# Altium PCB TYH-PD67W 2C1A 协议板0722.pcbdoc (part 2 of 2)
Units mm, origin at the board's own origin, x right, y up, seen from the top; angles counter-clockwise.
Board outline 32.75 x 24.76 mm, 5 copper layers (Top Layer, Signal Layer 3, Signal Layer 1, Signal Layer 2, Bottom Layer), stack 0.941 mm thick; 47 components, 178 nets, 247 pads, 161 vias.
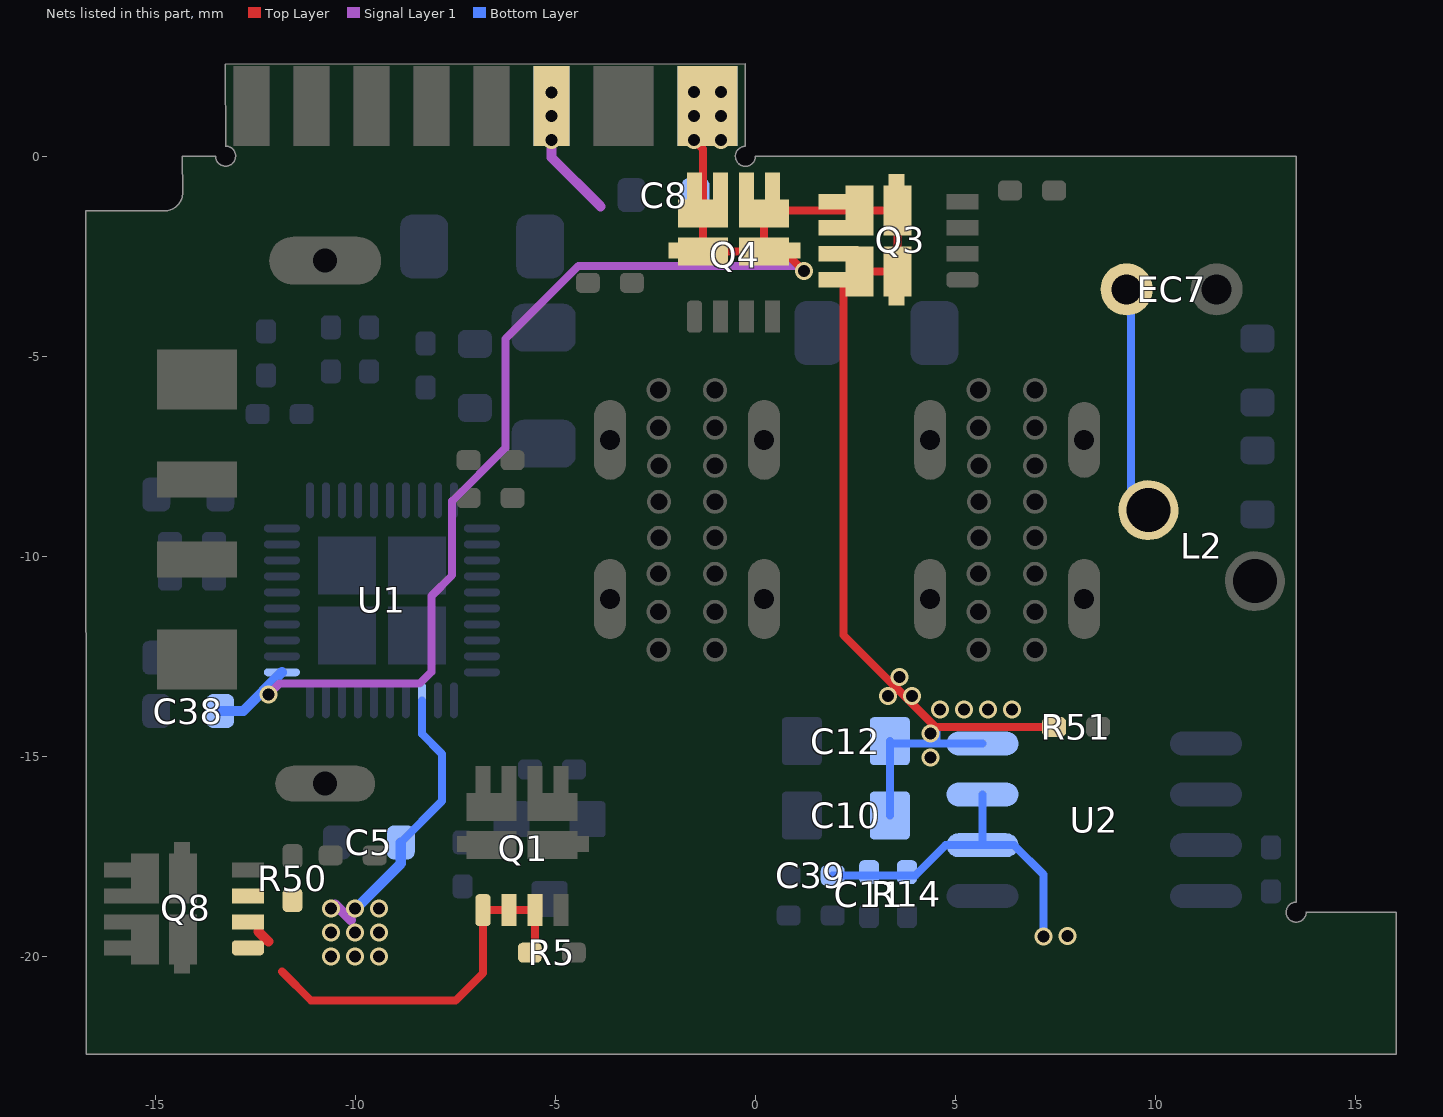
[diagram p4: the nets of this part, all layers, seen from the top]

## Via types
v1: diameter 0.45, hole 0.3, Top Layer to Bottom Layer, tented both sides, 140 vias
v2: diameter 0.5, hole 0.3, Top Layer to Bottom Layer, tented both sides, 21 vias

## Nets (pads, with @x,y where several pads share a name; then routed paths per layer and width w, separated by ;. In a path a pad name is that pad's centre, name@x,y a point inside that pad or via, vN(x,y) a via of type N, cw(c..) or ccw(c..) an arc to the next point about the centre after c; other vN are vias at no path point) (continued)
VIN: C8.1 C10.1 C12.1 C38.2 pad.1 Q3.5 Q3.6 Q3.7 Q3.8 Q4.5 Q4.6 Q4.7 Q4.8 R51.2 U1.1 U2.4 | length 56.2
  Top Layer w0.2: v1(-1.543,0.411) -1.314,0.182 Q4.8@-1.314,-1.432 Q4.8@-1.314,-2.385 Q4.8@0.212,-2.385 ; v1(1.21,-2.872) 0.723,-2.385 Q4.8@0.212,-2.385 ; R51.2@7.463,-14.269 4.495,-14.269 2.191,-11.965 2.191,-3.279 Q3.8@2.595,-2.876 Q3.8@3.547,-2.875 Q3.8@3.547,-1.349 0.295,-1.349 Q4.8@0.212,-1.432 Q4.8@0.212,-2.385
  Signal Layer 1 w0.2: v1(-12.175,-13.454) -11.903,-13.182 -8.398,-13.182 -8.102,-12.887 -8.102,-10.99 -7.585,-10.473 -7.585,-8.622 -6.251,-7.288 -6.251,-4.562 -4.432,-2.743 1.082,-2.743 v1(1.21,-2.872)
  Signal Layer 1 w0.254: v1@-12.267,-13.454 v1(-12.175,-13.454)
  Bottom Layer w0.2: C10.1@3.356,-16.479 C12.1@3.356,-14.621 3.418,-14.683 4.52,-14.683 ; v1@4.52,-14.293 4.52,-14.683 ; U2.4@5.671,-14.683 4.52,-14.683
  Bottom Layer w0.254: C38.2@-13.384,-13.868 -12.81,-13.868 U1.1@-11.843,-12.9
  other v1: 4.377,-15.032 4.377,-14.432 4.606,-13.827 5.206,-13.827 5.806,-13.827 6.406,-13.827 3.307,-13.491 3.907,-13.491 3.602,-13.015 -0.867,0.411 -1.543,1.01 -0.867,1.01
  other v2: -1.543,1.609 -0.867,1.609
VIN_3V: 
VMS: 
VOUT1: C5.2 C11.2 C39.1 EC7.1 L2.1 pad.2@-5.105,1.254 Q1.1 Q1.2 Q1.3 Q8.1 Q8.2 Q8.3 R5.1 R14.1 R50.1 U1.33 U2.2 U2.3 | length 33.2
  Top Layer w0.2: -11.842,-20.379 -11.111,-21.11 -7.501,-21.11 -6.815,-20.423 Q1.1@-6.815,-18.847 Q1.3@-5.515,-18.847 -5.515,-19.778 R5.1@-5.646,-19.909
  Top Layer w0.25: -12.432,-19.383 -12.183,-19.632
  Signal Layer 1 w0.254: v1@-10.515,-18.703 -10.123,-19.094 ; v1(-5.102,0.403) -5.102,-0.028 -3.879,-1.251
  Bottom Layer w0.2: C5.2@-8.871,-17.151 -7.84,-16.12 -7.84,-14.94 -8.343,-14.437 U1.33@-8.343,-13.6 ; C39.1@1.928,-17.979 3.992,-17.979 4.747,-17.223 U2.2@5.671,-17.223 ; U2.3@5.671,-15.953 U2.2@5.671,-17.223 ; v1(7.196,-19.502) 7.196,-17.956 6.463,-17.223 U2.2@5.671,-17.223 ; EC7.1@9.38,-3.424 9.38,-8.405 L2.1@9.821,-8.846
  Bottom Layer w0.254: v1@-9.958,-18.77 -8.871,-17.684 C5.2@-8.871,-17.151
  other v1: -10.61,-20.005 -10.01,-20.005 -9.41,-20.005 7.798,-19.493 -10.61,-19.405 -10.01,-19.405 -9.41,-19.405 -10.61,-18.805 -10.01,-18.805 -9.41,-18.805 -5.102,1.002
  other v2: -5.102,1.601
VXO: 
XGND: 
pads on no net: U1.5 U1.6 U1.7 U1.20 U1.21 U1.37 U1.38 USBA1.0@-10.761,-15.684 USBC1.SBU1 USBC1.SBU2

## Polygon pours and split planes (outlines as drawn)
NewNet42 on Bottom Layer "Bottom Layer-No Net" (solid, remove dead copper, pour order 115): 4.594,-4.33 7.388,-4.33 8.743,-5.686 8.743,-11.826 7.863,-12.706 4.42,-12.706 3.914,-12.2 3.914,-4.927 4.218,-4.623
NewNet24 on Bottom Layer "Bottom Layer-No Net" (solid, remove dead copper, pour order 133): 0.205,-5.373 -4.035,-5.373 -4.29,-5.628 -4.29,-11.881 -3.414,-12.758 -0.012,-12.758 0.787,-11.959 0.787,-5.955
NewNet41 on Bottom Layer "Bottom Layer-No Net" (solid, remove dead copper, pour order 114): 5.433,-6.473 7.115,-6.473 7.297,-6.655 7.297,-11.534 7.138,-11.693 7.097,-11.734 6.873,-11.734 5.384,-11.734 5.235,-11.585 5.235,-6.671 5.433,-6.473
A- on Bottom Layer "Bottom Layer-No Net" (solid, remove dead copper, pour order 119): -12.107,-1.618 -11.862,-1.373 -9.58,-1.373 -7.77,-1.373 -7.583,-1.56 -7.583,-2.991 -7.848,-3.256 -12.343,-3.256 -12.619,-2.981 -12.619,-2.13 -12.107,-1.618
VIN on Bottom Layer "Bottom Layer-No Net" (solid, remove dead copper, pour order 124): -13.714,-14.328 -12.738,-14.328 -11.923,-13.513 -11.393,-12.982 -11.393,-12.883 -11.477,-12.799 -11.534,-12.799 -12.274,-12.799 -12.526,-13.051 -12.816,-13.341 -13.31,-13.341 -13.601,-13.341 -13.812,-13.552 -13.812,-14.222 -13.732,-14.303
NewNet24 on Bottom Layer "Bottom Layer-No Net" (solid, remove dead copper, pour order 93): -5.861,-6.543 -5.034,-6.543 -4.872,-6.381 -4.872,-5.978 -4.485,-5.591 -4.268,-5.373 -4.143,-5.249 -3.324,-5.249 0.081,-5.249 0.787,-5.955 0.787,-11.959 -0.012,-12.758 -3.392,-12.758 -4.29,-11.859 -4.29,-8.579 -4.686,-8.182 -5.45,-8.182 -5.748,-8.182 -6.032,-7.898 -6.176,-7.755 -6.176,-7.584 -6.176,-6.756 -6.01,-6.59
VOUT1 on Bottom Layer "Bottom Layer-No Net" (solid, remove dead copper, pour order 95): -10.635,-20.282 -9.282,-20.282 -8.717,-19.716 -8.088,-19.088 -8.088,-17.466 -8.088,-16.828 -7.798,-16.537 -7.554,-16.293 -7.554,-15.965 -7.554,-15.086 -8.113,-14.527 -8.113,-16.004 -8.355,-16.245 -8.707,-16.598 -9.026,-16.598 -9.098,-16.598 -9.315,-16.814 -9.315,-17.536 -9.853,-18.074 -10.111,-18.332 -10.624,-18.332 -10.919,-18.626 -10.919,-18.848 -10.919,-20.089 -10.754,-20.253
SGND on Bottom Layer "Bottom Layer-No Net" (solid, remove dead copper, pour order 101): -4.07,2.234 -4.07,0.129 -4.566,-0.368 -4.67,-0.471 -7.434,-0.471 -13.886,-0.471 -14.326,-0.911 -14.782,-1.367 -16.741,-1.367 -16.741,-22.448 -16.736,-22.453 12.678,-22.453 12.946,-22.185 12.946,-0.48 12.502,-0.036 0.565,-0.036 0.292,-0.308 0.129,-0.471 -0.45,-0.471 -2.031,-0.471 -2.553,0.05 -2.553,2.237 -4.039,2.237
NewNet42 on Bottom Layer "Bottom Layer-No Net" (solid, remove dead copper, pour order 89): 4.08,-3.551 5.479,-3.551 6.259,-4.346 7.388,-4.346 8.743,-5.728 8.743,-11.99 7.863,-12.888 4.42,-12.888 3.914,-12.372 3.825,-12.28 3.825,-3.708 3.957,-3.573
A- on Top Layer "Bottom Layer-No Net" (solid, remove dead copper, pour order 106): -15,-6.369 -11.702,-6.369 -10.93,-5.598 -9.19,-3.857 -9.19,-3.034 -9.19,-2.072 -9.644,-1.618 -12.107,-1.618 -14.674,-4.185 -15.265,-4.776 -15.265,-5.349 -15.265,-6.183 -15.128,-6.32
VOUT1 on Top Layer "Bottom Layer-No Net" (solid, remove dead copper, pour order 80): -13.12,-18.286 -5.425,-18.286 -5.329,-18.382 -5.329,-20.243 -5.075,-20.498 -4.122,-20.498 -2.799,-19.176 8.698,-19.176 9.852,-18.022 9.852,-10.348 10.584,-9.615 ccw(c9.872,-8.902) 10.88,-8.902 10.88,-7.16 8.443,-4.723 8.443,-3.125 cw(c9.02,-3.125) 9.02,-2.548 9.832,-2.548 cw(c9.832,-2.823) 10.107,-2.823 ccw(c11.61,-2.823) 10.547,-3.886 12.604,-5.942 cw(c11.818,-6.727) 12.929,-6.727 12.929,-21.45 cw(c12.268,-21.45) 12.268,-22.111 -12.781,-22.111 cw(c-12.781,-21.694) -13.197,-21.694 -13.197,-18.363 cw(c-13.12,-18.363)
NewNet41 on Top Layer "Bottom Layer-No Net" (solid, remove dead copper, pour order 87): 4.769,-1.595 6.344,-1.595 6.711,-1.963 6.711,-6.085 7.134,-6.507 7.327,-6.7 7.327,-6.769 7.327,-11.539 7.136,-11.73 5.446,-11.73 5.258,-11.542 5.258,-6.638 5.534,-6.362 5.85,-6.046 5.85,-5.847 5.85,-5.306 5.695,-5.151 4.586,-4.042 4.586,-3.097 4.586,-1.74 4.706,-1.62
NewNet24 on Top Layer "Bottom Layer-No Net" (solid, remove dead copper, pour order 96): -4.198,-5.617 -4.198,-11.809 -3.228,-12.779 0.15,-12.779 0.521,-12.409 0.711,-12.219 0.711,-11.598 0.711,-5.879 0.205,-5.373 -3.954,-5.373 -4.198,-5.617
NewNet42 on Top Layer "Bottom Layer-No Net" (solid, remove dead copper, pour order 97): 7.388,-4.33 8.743,-5.686 8.743,-7.259 8.743,-12.146 7.992,-12.897 4.611,-12.897 3.914,-12.2 3.825,-12.111 3.825,-8.833 3.825,-6.006 4.645,-5.187 5.501,-4.33 7.388,-4.33
SGND on Top Layer "Bottom Layer-No Net" (solid, remove dead copper, pour order 100): -4.07,2.234 -4.07,0.129 -4.566,-0.368 -4.67,-0.471 -7.434,-0.471 -13.886,-0.471 -14.326,-0.911 -14.782,-1.367 -16.741,-1.367 -16.741,-22.448 -16.736,-22.453 12.678,-22.453 12.946,-22.185 12.946,-0.48 12.502,-0.036 0.565,-0.036 0.292,-0.308 0.129,-0.471 -0.45,-0.471 -2.031,-0.471 -2.553,0.05 -2.553,2.237 -4.039,2.237
VIN on Top Layer "Bottom Layer-No Net" (solid, remove dead copper, pour order 79): 7.785,-14.235 7.785,-13.819 ccw(c7.52,-13.819) 7.52,-13.554 4.829,-13.554 3.618,-12.343 3.618,-5.401 4.051,-4.968 4.051,-0.409 3.812,-0.169 -0.173,-0.169 -0.417,0.075 -0.417,2.142 -1.951,2.142 -1.951,-0.729 -2.343,-1.121 -2.343,-2.633 -2.226,-2.75 0.536,-2.75 1.108,-3.322 1.108,-4.967 0.988,-5.086 0.988,-12.092 4.204,-15.309 7.487,-15.309 7.767,-15.029
NewNet2 on Top Layer "Bottom Layer-No Net" (solid, remove dead copper, pour order 82): -7.387,-17.807 -3.679,-17.807 -1.207,-15.335 -1.207,-12.012 -0.714,-11.519 -0.714,-6.6 -1.275,-6.04 -1.275,-5.295 -0.854,-4.874 -0.326,-4.874 -0.034,-4.582 -0.034,-3.619 -0.083,-3.57 -2.354,-3.57 -2.454,-3.671 -2.454,-5.199 -2.184,-5.469 -2.184,-6.068 -2.736,-6.62 -2.736,-11.606 -2.176,-12.167 -2.176,-13.019 -3.679,-14.522 -6.653,-14.522 -7.625,-15.494 -7.625,-17.603 -7.437,-17.791
NewNet24 on Signal Layer 1 "Bottom Layer-No Net" (solid, remove dead copper, pour order 109): -4.373,-11.039 -4.373,-11.877 -3.468,-12.782 -3.289,-12.962 -0.603,-12.962 -0.092,-12.962 0.838,-12.031 1.006,-11.863 1.006,-11.615 1.006,-6.175 0.205,-5.373 -4.209,-5.373 -4.514,-5.678 -4.514,-10.873 -4.385,-11.001
VOUT1 on Signal Layer 1 "Bottom Layer-No Net" (solid, remove dead copper, pour order 116): 8.443,-2.747 8.443,-4.723 9.207,-5.487 10.88,-7.16 10.88,-7.775 10.88,-8.964 cw(c9.939,-8.964) 10.604,-9.629 9.871,-10.362 ccw(c9.919,-10.41) 9.852,-10.41 9.852,-18.022 9.441,-18.432 -11.269,-18.432 -11.459,-18.622 -11.459,-20.349 -11.252,-20.556 12.578,-20.556 12.929,-20.205 12.929,-6.727 10.377,-4.175 9.962,-3.76 9.962,-2.678 9.817,-2.533 8.657,-2.533 8.443,-2.747
NewNet42 on Signal Layer 1 "Bottom Layer-No Net" (solid, remove dead copper, pour order 110): 7.91,-12.909 8.743,-12.052 8.743,-5.73 7.246,-4.188 4.549,-4.188 3.677,-5.085 3.677,-12.245 4.323,-12.909
VOUT1 on Signal Layer 1 "Bottom Layer-No Net" (solid, remove dead copper, pour order 91): -11.459,-20.349 -11.459,-21.597 -10.979,-22.076 12.458,-22.076 12.929,-21.605 12.929,-20.205 12.929,-15.457 12.042,-14.57 10.754,-14.57 10.144,-15.18 9.852,-15.473 9.852,-18.022 9.441,-18.432 -11.269,-18.432 -11.459,-18.622
SGND on Signal Layer 1 "Bottom Layer-No Net" (solid, remove dead copper, pour order 99): -4.07,2.234 -4.07,0.129 -4.566,-0.368 -4.67,-0.471 -7.434,-0.471 -13.886,-0.471 -14.326,-0.911 -14.782,-1.367 -16.741,-1.367 -16.741,-22.448 -16.736,-22.453 12.678,-22.453 12.946,-22.185 12.946,-0.48 12.502,-0.036 0.565,-0.036 0.292,-0.308 0.129,-0.471 -0.45,-0.471 -2.031,-0.471 -2.553,0.05 -2.553,2.237 -4.039,2.237
NewNet2 on Signal Layer 2 "Bottom Layer-No Net" (solid, remove dead copper, pour order 85): -2.176,-13.019 -3.043,-13.886 -3.043,-15.402 -2.834,-15.611 -1.323,-15.611 -1.207,-15.494 -1.207,-12.012 -0.714,-11.519 -0.714,-6.6 -1.275,-6.04 -1.275,-4.577 -1.967,-3.884 -2.668,-3.884 -3.169,-4.385 -3.169,-4.824 -2.794,-5.199 -2.454,-5.199 -2.185,-5.468 -2.185,-6.109 -2.736,-6.661 -2.736,-11.606 -2.176,-12.167
NewNet41 on Signal Layer 2 "Bottom Layer-No Net" (solid, remove dead copper, pour order 94): 5.889,-2.962 6.712,-2.962 6.851,-3.101 6.851,-4.868 6.711,-5.008 6.711,-6.085 7.327,-6.7 7.327,-11.539 7.136,-11.73 5.449,-11.73 5.258,-11.539 5.258,-6.638 5.85,-6.046 5.85,-5.423 5.596,-5.17 5.596,-3.138 5.707,-3.027
NewNet24 on Signal Layer 2 "Bottom Layer-No Net" (solid, remove dead copper, pour order 102): -2.539,-5.403 -3.973,-5.403 -4.198,-5.627 -4.198,-11.809 -3.228,-12.779 0.15,-12.779 0.711,-12.219 0.711,-5.879 0.234,-5.403 -2.539,-5.403
NewNet42 on Signal Layer 2 "Bottom Layer-No Net" (solid, remove dead copper, pour order 103): 7.992,-12.897 4.873,-12.897 3.914,-11.938 3.677,-11.701 3.677,-11.388 3.677,-6.154 4.106,-5.725 4.406,-5.425 6.915,-5.425 8.109,-5.425 8.743,-6.059 8.743,-12.146 7.992,-12.897
SGND on Signal Layer 2 "Bottom Layer-No Net" (solid, remove dead copper, pour order 98): -4.07,2.234 -4.07,0.129 -4.67,-0.471 -13.886,-0.471 -14.782,-1.367 -16.741,-1.367 -16.741,-22.448 -16.736,-22.453 12.678,-22.453 12.946,-22.185 12.946,-0.48 12.502,-0.036 0.565,-0.036 0.129,-0.471 -1.759,-0.471 -2.553,0.323 -2.553,2.237 -4.039,2.237

## Keep-outs
Keep-Out Layer:
  lines w0.1: -13.501,0.004 -14.33,0.004 -14.326,-0.911 cw(c-14.776,-0.913) -14.775,-1.363 -16.741,-1.367 -16.736,-22.453 16.014,-22.453 16.014,-18.896 13.764,-18.896 cw(c13.514,-18.896) 13.514,-18.646 13.514,0.004 -0.005,0.004 ; -13.501,0.004 ccw(c-13.251,0.004) -13.251,0.254 -13.255,2.304 ; -13.255,2.303 -0.255,2.308 ; -0.255,2.304 -0.255,0.25 ccw(c-0.255,0) -0.005,0

## Other copper
Top Layer:
  rectangle net VIN: -0.876,-0.909 -0.417,0.075
  pour cut-out: -9.626,-4.446 -9.626,-4.877 -9.509,-4.994 -9.509,-6.244 -9.032,-6.721 -9.029,-6.721 -9.029,-6.937 -8.795,-7.171 -8.346,-7.171 -8.116,-6.942 -8.116,-6.509 -8.375,-6.25 -8.574,-6.25 -8.854,-5.971 -8.854,-5.022 -8.714,-4.882 -8.714,-4.45 -8.973,-4.191 -9.371,-4.191
  region net SCL: -10.057,2.236 -10.057,-0.06 -9.886,-0.23 -9.31,-0.23 -9.155,-0.076 -9.155,2.236
  region net SDA: -11.557,2.236 -11.557,-0.06 -11.386,-0.23 -10.81,-0.23 -10.655,-0.076 -10.655,2.236
  region net VIN: -1.951,2.142 -1.951,0.047 -1.784,-0.12 -0.612,-0.12 -0.417,0.075 -0.417,2.142
  region net NewNet33: -13.057,2.236 -13.057,-0.06 -12.886,-0.23 -12.31,-0.23 -12.155,-0.076 -12.155,2.236
  region net SWCLK2: -8.557,2.236 -8.557,-0.06 -8.098,-0.519 -7.655,-0.076 -7.655,2.236
  region net SWDIO2: -7.057,2.236 -7.057,-0.06 -6.886,-0.23 -6.31,-0.23 -6.155,-0.076 -6.155,2.236
  region net VOUT1: -5.557,2.236 -5.557,-0.06 -5.386,-0.23 -5.08,-0.23 -4.655,0.194 -4.655,2.236
  region net A+: -15.09,-11.738 -12.955,-11.738 -12.835,-11.858 -12.835,-15.841 -13.808,-16.814 -13.808,-19.938 -14.138,-20.269 -15.863,-20.269 -16.474,-19.657 -16.474,-16.102 -15.207,-14.835 -15.207,-11.855
  region net A-: -11.862,-1.373 -9.889,-1.373 -9.19,-2.072 -9.19,-2.952 -9.563,-3.325 -11.812,-3.325 -12.561,-2.577 -12.561,-2.072
  pour cut-out: -15.411,-13.127 -15.019,-13.519 -13.172,-13.519 -12.631,-12.978 -12.631,-8.325 -12.702,-8.254 -13.017,-8.57 -15.411,-8.57
  region net SRCG_A: -13.009,-17.165 -10.381,-17.165 -10.26,-17.285 -10.26,-17.897 -10.391,-18.027 -13.11,-18.027 -13.196,-17.941 -13.196,-17.352
  region net VOUT1: -13.12,-18.286 -13.197,-18.363 -13.197,-20.559 -12.939,-20.817 -11.669,-20.817 -11.455,-20.603 -11.455,-18.422 -11.592,-18.286
  region net A+: -16.474,-20.778 -16.257,-20.995 -14.118,-20.995 -13.808,-20.685 -13.808,-18.376 -16.339,-18.376 -16.474,-18.511
  region net NewNet2: -3.169,-4.385 -3.169,-4.824 -2.794,-5.199 -2.018,-5.199 -1.77,-4.951 -1.77,-3.757 -1.957,-3.57 -2.354,-3.57
  region net NewNet41: 6.344,-1.595 6.657,-1.595 6.851,-1.789 6.851,-4.868 6.474,-5.245 6.344,-5.115
  region net NewNet28: 4.743,-1.331 6.588,-1.331 6.728,-1.19 6.728,-0.515 6.611,-0.397 4.744,-0.397 4.586,-0.556 4.586,-1.173
  region net NewNet6: 0.285,-4.701 0.742,-4.701 0.836,-4.607 0.836,-3.571 0.327,-3.063 -0.107,-3.063 -0.198,-3.154 -0.097,-3.255 0.114,-3.255 0.234,-3.375 0.234,-4.65
  region net NewNet13: -4.952,-18.291 -3.834,-18.291 cw(c-3.834,-18.466) -3.658,-18.466 -3.658,-19.621 -4.235,-20.198 -4.797,-20.198 -5.057,-19.938 -5.057,-18.396
Signal Layer 1:
  rectangle net VIN: -1.84,0.166 -0.584,1.888
  region net SCL: -10.057,2.236 -10.057,-0.06 -9.886,-0.23 -9.31,-0.23 -9.155,-0.076 -9.155,2.236
  region net SDA: -11.557,2.236 -11.557,-0.06 -11.386,-0.23 -10.81,-0.23 -10.655,-0.076 -10.655,2.236
  region net SWDIO2: -7.057,2.236 -7.057,-0.06 -6.886,-0.23 -6.31,-0.23 -6.155,-0.076 -6.155,2.236
  region net VOUT1: -4.655,2.236 -4.655,0.023 -3.727,-0.905 9.153,-0.905 10.107,-1.859 10.107,-4.252 9.791,-4.567 8.835,-4.567 8.443,-4.175 8.443,-2.125 7.868,-1.551 -4.065,-1.551 -5.557,-0.06 -5.557,2.236
  region net VOUT1: -5.557,2.236 -5.557,-0.06 -5.386,-0.23 -5.08,-0.23 -4.655,0.194 -4.655,2.236
  region net SWCLK2: -8.557,2.236 -8.557,-0.06 -8.386,-0.23 -7.81,-0.23 -7.655,-0.076 -7.655,2.236
  region net NewNet33: -13.057,2.236 -13.057,-0.06 -12.886,-0.23 -12.31,-0.23 -12.155,-0.076 -12.155,2.236
  pour cut-out: 2.521,-4.369 2.521,-3.793 1.372,-2.644 -7.011,-2.644 -8.671,-4.305 -10.781,-4.305 -11.195,-4.719 -11.644,-4.719 -11.878,-4.485 -11.878,-4.049 -11.571,-3.741 -8.956,-3.741 -7.245,-2.03 1.637,-2.03 3.146,-3.539 3.146,-4.366
  region net VIN: 4.204,-15.309 5.308,-15.309 6.668,-13.949 6.668,-13.707 6.515,-13.554 4.589,-13.554 3.754,-12.719 3.475,-12.719 3.019,-13.175 3.019,-14.123
  region net NewNet41: 6.669,-2.95 6.801,-3.082 6.801,-3.97 6.676,-4.096 4.961,-4.096 4.891,-4.026 4.891,-3.947 5.888,-2.95
  region net NewNet2: -3.066,-4.761 -2.036,-4.761 -1.905,-4.63 -1.905,-4.39 -2.351,-3.944 -2.728,-3.944 -3.169,-4.385 -3.169,-4.658
  region net NewNet2: -2.845,-15.056 -1.414,-15.056 -1.293,-15.178 -1.293,-15.406 -1.406,-15.52 -2.829,-15.52 -2.961,-15.388 -2.961,-15.172
Signal Layer 2:
  rectangle net VIN: -1.824,0.158 -0.625,1.882
  region net VOUT1: -10.625,-18.574 -9.299,-18.574 -9.177,-18.696 -9.177,-20.218 -9.29,-20.332 -10.688,-20.332 -10.844,-20.175 -10.844,-18.712 -10.719,-18.586
  region net SWDIO2: -7.057,2.236 -7.057,0.378 -6.735,0.057 -6.155,0.057 -6.155,2.236
  region net VIN: 3.487,-12.764 3.685,-12.764 4.475,-13.554 6.543,-13.554 6.663,-13.674 6.663,-13.997 6.593,-14.067 4.977,-14.067 4.715,-14.329 4.715,-15.13 4.536,-15.309 4.204,-15.309 4.084,-15.188 4.084,-14.113 3.781,-13.809 3.214,-13.809 3.015,-13.61 3.015,-13.236
  region net NewNet33: -13.057,2.236 -13.057,-0.06 -12.886,-0.23 -12.31,-0.23 -12.155,-0.076 -12.155,2.236
  region net SDA: -11.557,2.236 -11.557,-0.06 -11.386,-0.23 -10.81,-0.23 -10.655,-0.076 -10.655,2.236
  region net SCL: -10.057,2.236 -10.057,-0.06 -9.886,-0.23 -9.31,-0.23 -9.155,-0.076 -9.155,2.236
  region net SWCLK2: -8.557,2.236 -8.557,-0.06 -8.386,-0.23 -7.81,-0.23 -7.655,-0.076 -7.655,2.236
  region net VOUT1: -5.557,2.236 -5.557,0.064 -5.349,-0.144 -4.847,-0.144 -4.655,0.048 -4.655,2.236
  region net VOUT1: 9.001,-9.366 9.001,-5.745 8.537,-5.281 8.537,-2.905 8.82,-2.622 9.642,-2.622 9.989,-2.968 9.989,-4.665 10.593,-5.269 10.593,-9.152 10.099,-9.646 9.281,-9.646
Bottom Layer:
  rectangle net NewNet36: -12.486,-6.5 -12.152,-5.471
  rectangle net CPA: -10.559,-5.663 -9.639,-5.102
  region net SCL: -10.057,2.236 -10.057,-0.06 -9.886,-0.23 -9.31,-0.23 -9.155,-0.076 -9.155,2.236
  region net SDA: -11.557,2.236 -11.557,-0.06 -11.386,-0.23 -10.81,-0.23 -10.655,-0.076 -10.655,2.236
  region net VOUT1: -5.557,2.236 -5.557,-0.06 -5.386,-0.23 -5.08,-0.23 -4.655,0.194 -4.655,2.236
  region net SWDIO2: -7.057,2.236 -7.057,-0.06 -6.886,-0.23 -6.31,-0.23 -6.155,-0.076 -6.155,2.236
  region net SWCLK2: -8.557,2.236 -8.557,-0.06 -8.386,-0.23 -7.81,-0.23 -7.655,-0.076 -7.655,2.236
  region net NewNet33: -13.058,2.247 -13.058,-1.24 -13.004,-1.294 -12.996,-1.294 -12.154,-0.451 -12.154,2.247
  pour cut-out: -5.97,-1.944 -6.526,-1.944 -6.948,-2.365 -6.948,-3.089 -7.498,-3.639 -9.965,-3.639 -10.223,-3.897 -10.223,-4.764 -10.028,-4.959 -9.517,-4.959 -9.38,-5.096 -8.93,-5.096 -8.711,-4.878 -8.711,-4.394 -8.57,-4.253 -7.193,-4.253 -6.284,-3.345 -6.284,-2.682 -6.194,-2.592 -5.939,-2.592 -5.837,-2.489 -5.837,-2.019 -5.903,-1.953
  pour cut-out: -10.928,-9.291 -10.574,-9.291 -10.445,-9.161 -10.445,-6.785 -10.749,-6.481 -10.749,-6.008 -11.056,-5.701 -11.056,-4.723 -10.951,-4.618 -10.951,-4.002 -11.162,-3.791 -11.621,-3.791 -11.877,-4.047 -11.877,-4.44 -11.742,-4.574 -11.742,-5.928 -11.943,-6.128 -11.943,-6.728 -11.685,-6.986 -11.252,-6.986 -11.043,-7.195 -11.043,-9.176
  region net NewNet32: -15.263,-7.931 -14.381,-7.931 -14.272,-8.04 -14.272,-10.863 -14.383,-10.974 -15.122,-10.974 -15.387,-10.709 -15.387,-8.055
  region net NewNet34: -13.623,-11.995 -11.444,-11.995 -11.364,-12.075 -11.364,-12.523 -11.439,-12.598 -12.592,-12.598 -12.972,-12.978 -13.672,-12.978 -13.777,-12.873 -13.777,-12.149
  region net VOUT1: 10.289,-9.755 9.389,-9.755 9.001,-9.366 9.001,-5.494 8.443,-4.935 8.443,-2.747 8.657,-2.533 9.817,-2.533 10.107,-2.823 10.107,-4.125 10.738,-4.756 10.738,-9.306
  region net VIN: 2.522,-13.74 3.502,-12.76 3.857,-12.76 4.313,-13.216 6.528,-13.216 6.679,-13.367 6.679,-14.898 6.479,-15.098 4.882,-15.098 4.398,-15.582 4.398,-16.868 4.131,-17.136 2.675,-17.136 2.522,-16.983
  region net NewNet18: -7.531,-17.502 -5.989,-17.502 -5.301,-16.814 -5.301,-15.036 -5.436,-14.901 -5.792,-14.901 -7.654,-16.764 -7.654,-17.379
  region net NewNet2: -2.825,-15.055 -1.423,-15.055 -1.288,-15.19 -1.288,-15.393 -1.419,-15.524 -2.82,-15.524 -2.959,-15.385 -2.959,-15.19
  region net NewNet2: -3.037,-4.79 -2.033,-4.79 -1.888,-4.645 -1.888,-4.394 -2.359,-3.923 -2.707,-3.923 -3.169,-4.385 -3.169,-4.658
  region net VIN: -1.951,2.142 -1.951,-1.272 -1.76,-1.463 -0.787,-1.463 -0.417,-1.094 -0.417,2.142
  region net VFB1: 1.684,-19.317 6.171,-19.317 6.642,-18.846 6.642,-18.293 6.447,-18.098 4.614,-18.098 4.09,-18.622 1.695,-18.622 1.575,-18.742 1.575,-19.209
  region net VOUT1: 7.063,-19.803 7.986,-19.803 8.163,-19.626 8.163,-19.43 7.405,-18.672 7.405,-17.812 6.761,-17.168 6.761,-15.817 6.574,-15.63 4.938,-15.63 4.744,-15.823 4.744,-17.045 4.283,-17.506 1.749,-17.506 1.608,-17.647 1.608,-18.222 1.628,-18.243 3.992,-18.243 4.708,-17.526 6.557,-17.526 6.947,-17.916 6.947,-19.686
  pour cut-out: -5.68,-4.848 -5.68,-4.996 -5.855,-5.171 -8.574,-5.171 -8.756,-5.353 -8.756,-5.649 -9.444,-6.337 -9.444,-9.155 -9.29,-9.309 -8.561,-9.309 -8.445,-9.193 -8.445,-7.27 -8.076,-6.901 -8.076,-6.504 -7.38,-5.808 -5.527,-5.808 -4.997,-5.278 -4.997,-4.848
  pour cut-out: 2.104,-4.08 2.883,-4.08 3.28,-4.476 3.28,-4.87 3.017,-5.132 2.659,-5.132 2.41,-4.883 2.41,-4.771 2.359,-4.72 2.103,-4.72
  region net NewNet41: 5.829,-2.978 6.684,-2.978 6.802,-3.097 6.802,-3.939 6.66,-4.081 6.381,-4.081 5.684,-3.384 5.684,-3.123
  region net SW-SR: 12.279,-8.523 13.042,-8.523 cw(c13.042,-8.739) 13.258,-8.739 13.258,-10.873 cw(c12.701,-10.873) 12.701,-11.429 12.615,-11.429 cw(c12.615,-10.472) 11.938,-11.149 11.936,-11.147 cw(c12.44,-10.643) 11.728,-10.643 11.728,-10.62 cw(c12.498,-10.62) 11.953,-10.075 ccw(c11.768,-9.889) 12.03,-9.889 12.03,-8.701 cw(c12.203,-8.701) 12.203,-8.528
  region net SW-SR: 10.792,-16.247 12.884,-16.247 ccw(c12.884,-15.863) 13.269,-15.863 13.269,-8.745 ccw(c13.042,-8.745) 13.042,-8.519 12.209,-8.519 ccw(c12.209,-8.701) 12.027,-8.701 12.027,-9.415 cw(c11.094,-9.415) 11.754,-10.074 11.003,-10.824 ccw(c12.799,-12.62) 10.259,-12.62 10.259,-15.94 ccw(c10.566,-15.94) 10.566,-16.247
Multi-Layer:
  pour cut-out: -8.774,-6.25 -8.342,-6.25 -8.076,-6.516 -8.076,-6.901 -8.346,-7.171 -8.795,-7.171 -9.029,-6.937 -9.029,-6.505
  pour cut-out: -9.371,-4.191 -8.973,-4.191 -8.714,-4.45 -8.714,-4.882 -8.944,-5.111 -9.392,-5.111 -9.626,-4.877 -9.626,-4.446
  pour cut-out: -11.623,-3.799 -11.225,-3.799 -10.966,-4.058 -10.966,-4.49 -11.195,-4.719 -11.644,-4.719 -11.878,-4.485 -11.878,-4.054
  pour cut-out: 2.659,-5.132 3.017,-5.132 3.28,-4.87 3.28,-4.499 3.012,-4.232 2.658,-4.232 2.384,-4.506 2.384,-4.857

## Silkscreen, mask and mechanical layers (free items; w line width, h text height)
Top Overlay:
  circle w0.1: c-1.068,-9.589 r0.21
  circle w0.1: c-2.468,-9.589 r0.21
  circle w0.1: c-1.068,-12.389 r0.21
  circle w0.1: c-1.068,-11.439 r0.21
  circle w0.1: c-2.478,-10.489 r0.21
  circle w0.1: c-2.478,-11.439 r0.21
  circle w0.1: c-2.478,-12.389 r0.21
  circle w0.1: c6.933,-9.589 r0.21
  circle w0.1: c6.933,-12.389 r0.21
  circle w0.1: c6.933,-11.439 r0.21
  circle w0.1: c5.533,-9.589 r0.21
  circle w0.1: c5.523,-10.489 r0.21
  circle w0.1: c5.523,-11.439 r0.21
  circle w0.1: c5.523,-12.389 r0.21
  circle w0.1: c-1.069,-5.897 r0.21
  circle w0.1: c-1.068,-7.789 r0.21
  circle w0.1: c-1.068,-8.689 r0.21
  circle w0.1: c-1.068,-6.839 r0.21
  circle w0.1: c-2.476,-5.892 r0.21
  circle w0.1: c-2.468,-8.689 r0.21
  circle w0.1: c-2.478,-6.839 r0.21
  circle w0.1: c6.933,-8.689 r0.21
  circle w0.1: c6.933,-7.789 r0.21
  circle w0.1: c5.524,-5.892 r0.21
  circle w0.1: c6.931,-5.897 r0.21
  circle w0.1: c5.523,-6.839 r0.21
  circle w0.1: c6.933,-6.839 r0.21
  circle w0.1: c5.533,-8.689 r0.21
  rectangle: -15.889,-10.569 -14.967,-6.326
  rectangle: -15.889,-7.641 -12.538,-6.326
  lines w0.1: -16.737,-20.853 16.018,-20.849 ; -12.999,-15.696 cw(c-13.001,-15.085) -13.611,-15.084 -13.611,-4.151 -13.623,-3.096 ; -12.999,-15.684 -8.499,-15.684 ccw(c-8.487,-15.084) -7.888,-15.084 -7.899,-3.084 ; -10.761,-9.084 -10.761,-2.484 ; -8.499,-2.484 -12.999,-2.484 ccw(c-12.998,-3.109) -13.623,-3.096 ; -7.899,-3.096 -13.623,-3.096 ; -2.478,-12.389 -2.268,-12.389 ; -1.068,-12.389 -0.858,-12.389 ; 5.523,-12.389 5.733,-12.389 ; 6.933,-12.389 7.143,-12.389 ; -11.611,-16.035 cw(c-11.611,-15.735) -11.611,-15.435 -10.011,-15.435 cw(c-10.011,-15.735) -10.011,-16.035 -11.611,-16.035 ; -11.611,-2.96 cw(c-11.611,-2.66) -11.611,-2.36 -10.011,-2.36 cw(c-10.011,-2.66) -10.011,-2.96 -11.611,-2.96 ; -3.938,-7.689 ccw(c-3.688,-7.689) -3.438,-7.689 -3.438,-6.589 ccw(c-3.688,-6.589) -3.938,-6.589 -3.938,-7.689 ; -3.938,-11.669 ccw(c-3.688,-11.669) -3.438,-11.669 -3.438,-10.569 ccw(c-3.688,-10.569) -3.938,-10.569 -3.938,-11.669 ; -3.312,-12.321 ccw(c-2.062,-12.321) -2.063,-13.571 -1.353,-13.572 ccw(c-1.352,-12.322) -0.102,-12.323 -0.098,-5.883 ccw(c-1.348,-5.882) -1.348,-4.632 -2.058,-4.631 ccw(c-2.058,-5.881) -3.308,-5.881 -3.312,-12.321 ; -0.088,-11.669 ccw(c0.162,-11.669) 0.412,-11.669 0.412,-10.569 ccw(c0.162,-10.569) -0.088,-10.569 -0.088,-11.669 ; -0.088,-7.689 ccw(c0.162,-7.689) 0.412,-7.689 0.412,-6.589 ccw(c0.162,-6.589) -0.088,-6.589 -0.088,-7.689 ; 4.063,-11.669 ccw(c4.313,-11.669) 4.563,-11.669 4.563,-10.569 ccw(c4.313,-10.569) 4.063,-10.569 4.063,-11.669 ; 4.063,-7.689 ccw(c4.313,-7.689) 4.563,-7.689 4.563,-6.589 ccw(c4.313,-6.589) 4.063,-6.589 4.063,-7.689 ; 4.688,-12.312 ccw(c5.938,-12.313) 5.937,-13.563 6.647,-13.564 ccw(c6.648,-12.314) 7.898,-12.314 7.902,-5.874 ccw(c6.652,-5.874) 6.653,-4.624 5.943,-4.623 ccw(c5.942,-5.873) 4.692,-5.872 4.688,-12.312 ; 7.913,-11.669 ccw(c8.163,-11.669) 8.413,-11.669 8.413,-10.569 ccw(c8.163,-10.569) 7.913,-10.569 7.913,-11.669 ; 7.913,-7.689 ccw(c8.163,-7.689) 8.413,-7.689 8.413,-6.589 ccw(c8.163,-6.589) 7.913,-6.589 7.913,-7.689
  text "NMOS" at -2.977,-0.463 h0.5 r270
  text "NMOS" at 4.518,-3.999 h0.5 r180
  text "PMOS" at -12.622,-16.293 h0.5 r180
  text "PMOS" at -8.434,-16.493 h0.5 r270